# Altium PCB pickplace.PcbDoc
Units mil, origin at the board's own origin, x right, y up, seen from the top; angles counter-clockwise.
Board outline 6000 x 4000 mil, 2 copper layers (Top Layer, Bottom Layer); 137 components, 0 nets, 400 pads, 87 vias.
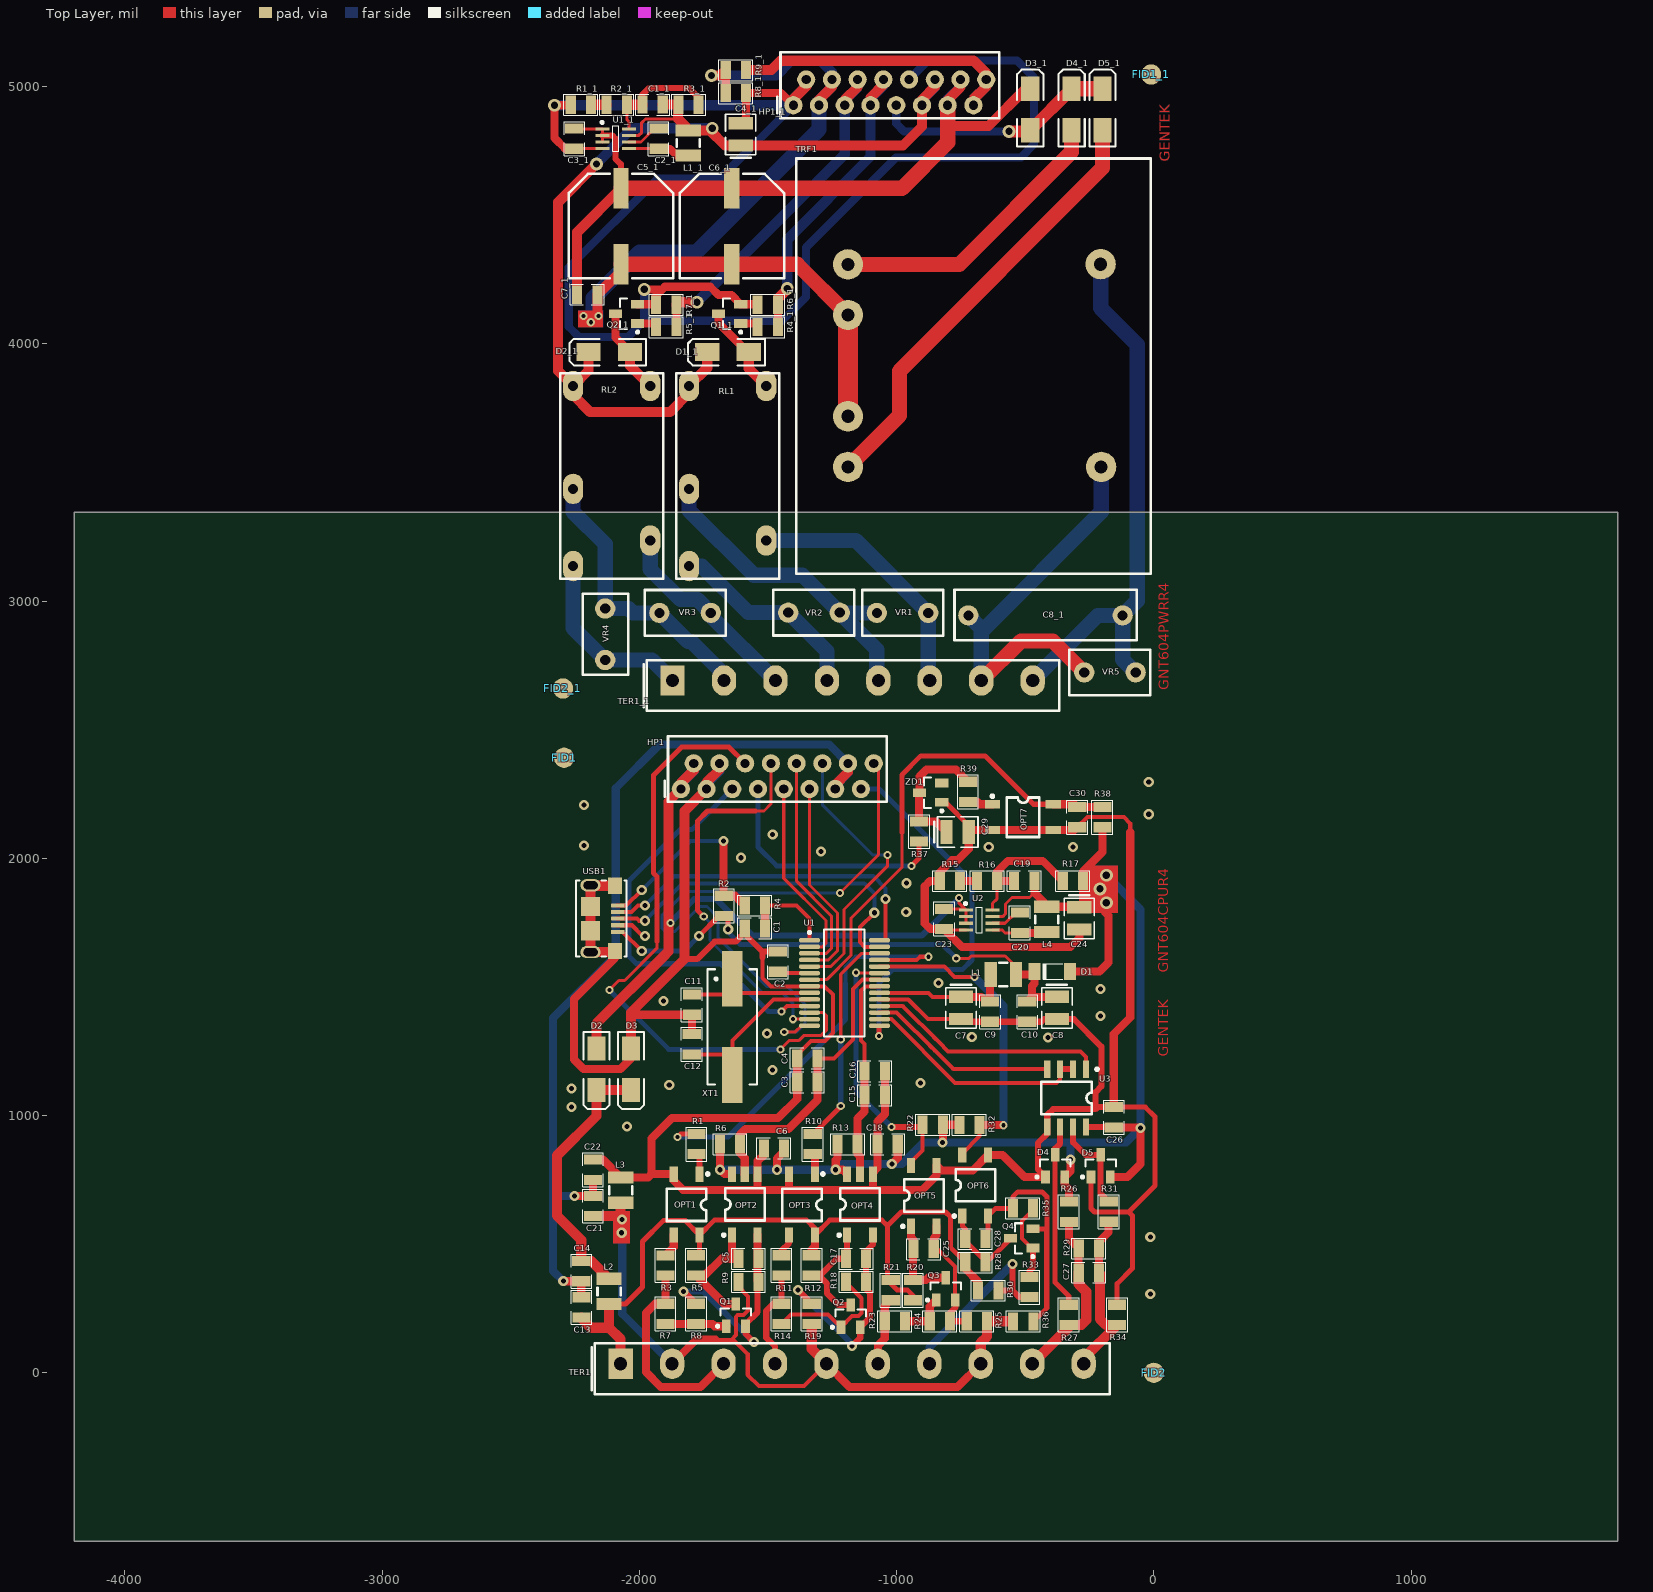
[diagram p0: Top Layer view]
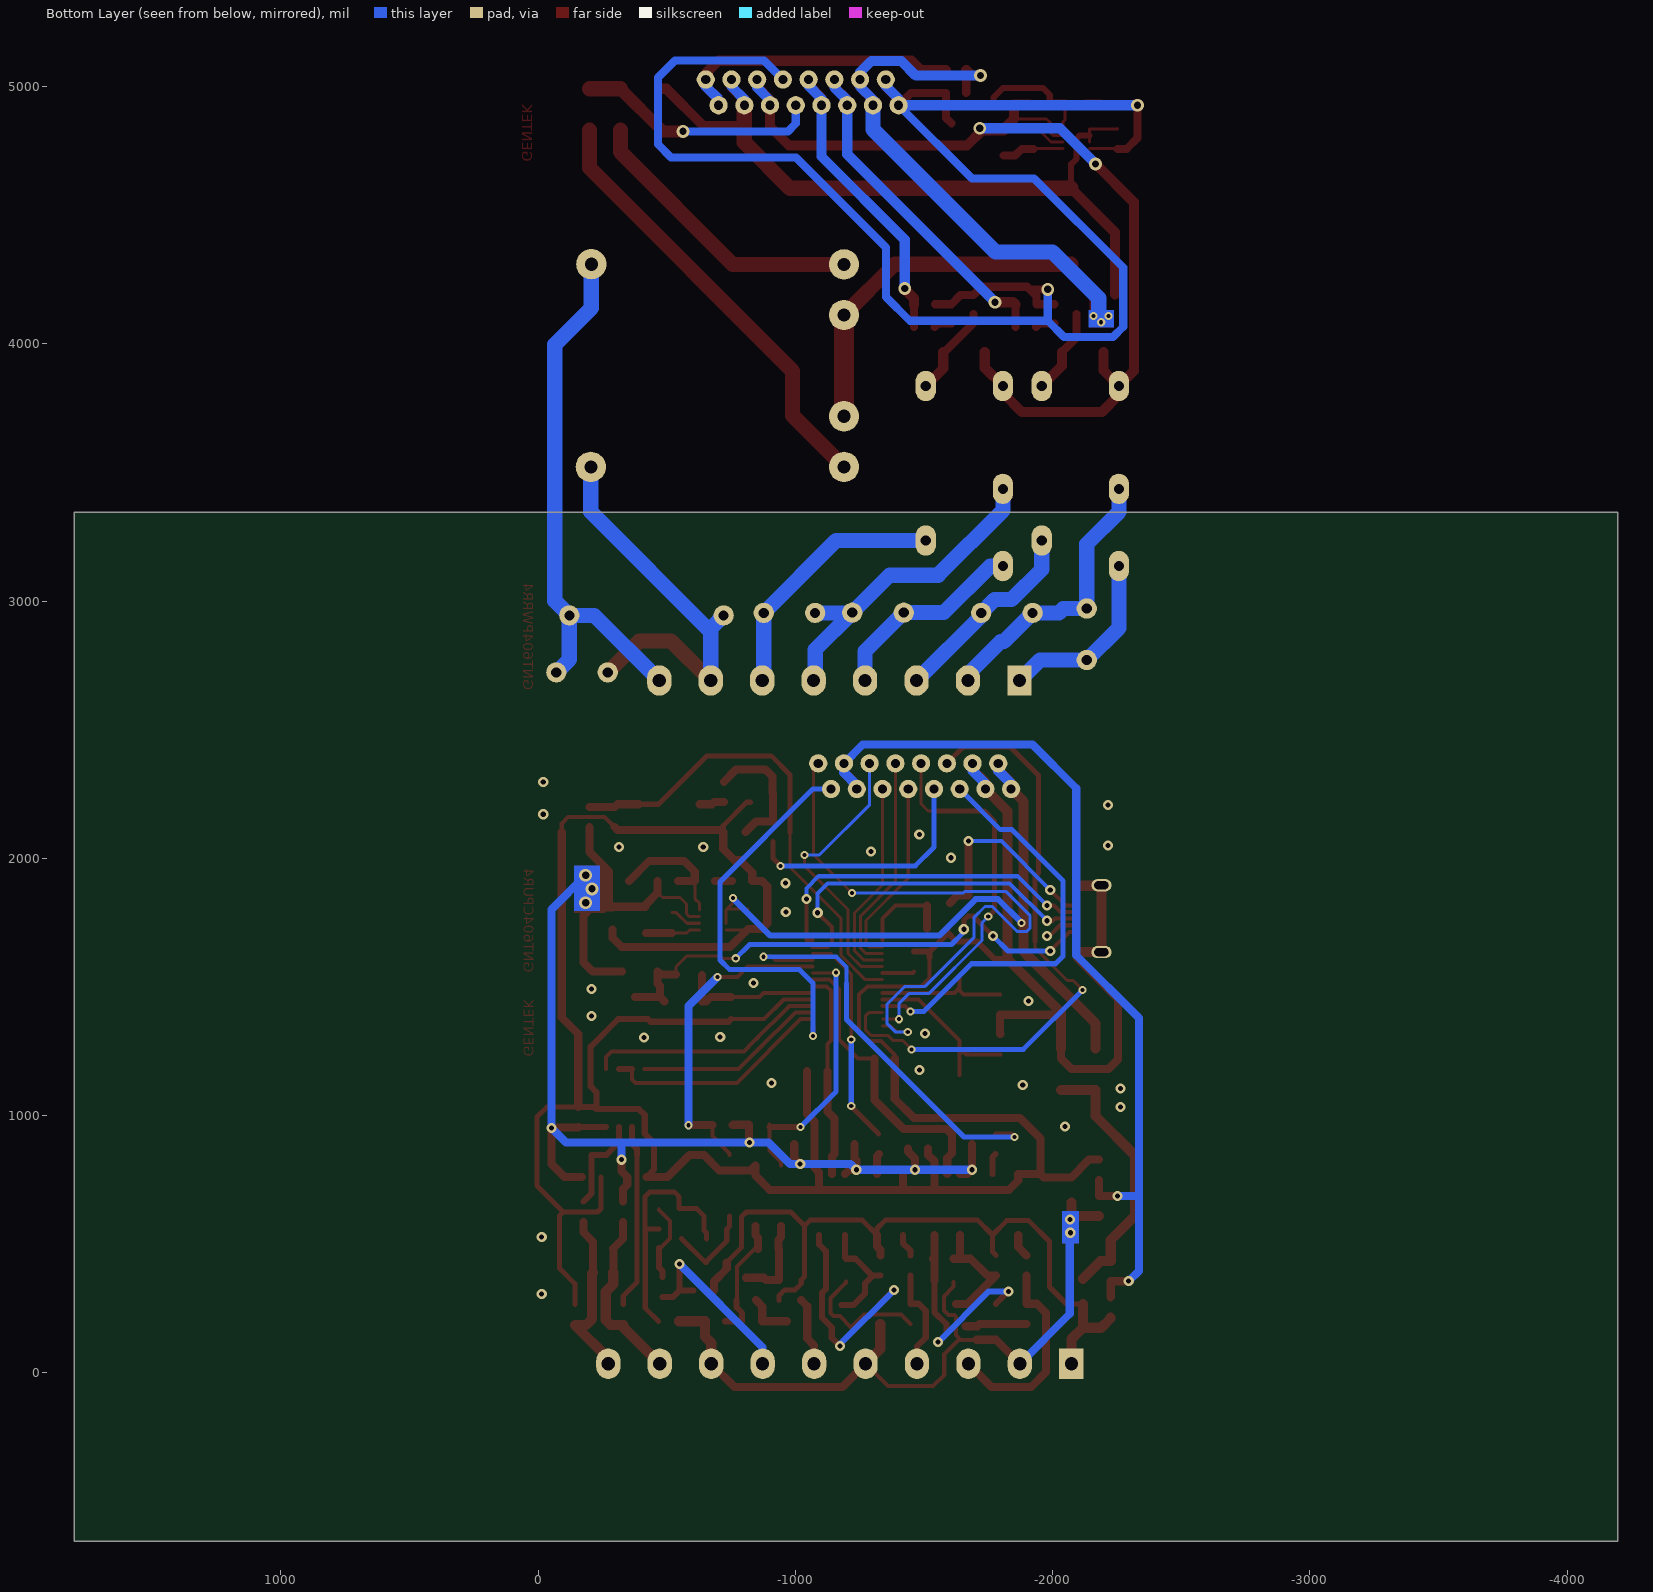
[diagram p1: Bottom Layer view, seen from below]

## Layer stack, top to bottom
Top Solder: solder mask 0.4, Solder Resist, Dk 3.5
Top Layer: signal copper 1.4
Dielectric 1: dielectric 12.6, FR-4, Dk 4.8
Bottom Layer: signal copper 1.4
Bottom Solder: solder mask 0.4, Solder Resist, Dk 3.5

## Board outline
-4197,-655 1803,-655 1803,3345 -4197,3345

## Design rules (kind name [scope] priority, off if disabled: settings)
Clearance [All] p1: gap=10
PolygonConnect [All] p1: connectstyle=Relief reliefconductorwidth=10 reliefentries=4 polygonreliefangle="90 Angle" airgapwidth=10
RoutingVias [All] p1: holewidth=28 width=50 viastyle="Through Hole" minholewidth=28 minwidth=50 maxholewidth=28 maxwidth=50
SolderMaskExpansion [All] p1: expansion=4
Width [All] p1: maxlimit=10 minlimit=10 preferedwidth=10
30 further rules are at their usual default settings.

## Components (designator, comment, footprint, x,y, rotation, side; value= is the part's Value field where it differs from the comment)
C1 "100nF" CC0805 -1551,1727 r180 top
C1_1 "47pF" CC0805 -1948.66,4930.16 r0 top (schematic designator C1)
C2 "100nF" CC0805 -1462,1598 r90 top
C2_1 "470nF" CC0805 -1925.37,4797.27 r270 top (schematic designator C2)
C3 "100pF" CC0805 -1347,1129 r180 top
C3_1 "100nF" CC0805 -2253.13,4797.27 r90 top (schematic designator C3)
C4 "10nF" CC0805 -1347,1221.95 r180 top
C4_1 "47uF/10V" CAPSMDTANTAL-B -1606.47,4814 r90 top (schematic designator C4)
C5 "10nF" CC0805 -1576,443 r0 top
C5_1 "470uF/25V" CAPSMD-10x10 -2072.02,4604.35 r270 top (schematic designator C5)
C6 "100nF" CC0805 -1477,872 r180 top
C6_1 "470uF/25V" CAPSMD-10x10 -1640.92,4604.35 r270 top (schematic designator C6)
C7 "47uF/10V" CAPSMDTANTAL-B -750,1418 r270 top
C7_1 "100nF" CC0805 -2202.93,4190.97 r180 top (schematic designator C7)
C8 "47uF/10V" CAPSMDTANTAL-B -377,1418 r270 top
C8_1 "100nF/275V/X2" CAPAXIAL/275V/X2 -421.43,2943.92 r180 top (schematic designator C8)
C9 "100nF" CC0805 -637,1403.84 r90 top
C10 "100nF" CC0805 -492,1403.84 r90 top
C11 "22pF" CC0805 -1796,1431 r270 top
C12 "22pF" CC0805 -1797.05,1277 r90 top
C13 "100nF" CC0805 -2225,254 r270 top
C14 "100nF" CC0805 -2226.05,395 r90 top
C15 "100pF" CC0805 -1085,1079.05 r0 top
C16 "10nF" CC0805 -1085,1172 r0 top
C17 "10nF" CC0805 -1158,443 r0 top
C18 "100nF" CC0805 -1035,887.95 r180 top
C19 "47pF" CC0805 -504,1912 r0 top
C20 "470nF" CC0805 -521,1749 r270 top
C21 "100nF" CC0805 -2180,648 r270 top
C22 "100nF" CC0805 -2181.05,789 r90 top
C23 "100nF" CC0805 -816,1764 r90 top
C24 "47uF/10V" CAPSMDTANTAL-B -290,1766 r270 top
C25 "100nF" CC0805 -895,481 r0 top
C26 "100nF" CC0805 -156,993 r90 top
C27 "47pF" CC0805 -253.05,389 r180 top
C28 "100nF" CC0805 -694.05,520 r0 top
C29 "47uF/10V" CAPSMDTANTAL-B -763,2102 r0 top
C30 "100nF" CC0805 -298,2160.05 r270 top
D1 "LL4148" CD-SOD80 -330,1560 r180 top
D1_1 "US1M" CD-SMA_DO214 -1655.68,3967.54 r180 top (schematic designator D1)
D2 "M7" CD-SMA_DO214 -2167,1180 r270 top
D2_1 "US1M" CD-SMA_DO214 -2117.3,3967.54 r180 top (schematic designator D2)
D3 "US1M" CD-SMA_DO214 -2033,1180 r270 top
D3_1 "M7" CD-SMA_DO214 -480.49,4910.46 r90 top (schematic designator D3)
D4 "BAV99" SOT23_N -384,802 r90 top
D4_1 "M7" CD-SMA_DO214 -320.06,4910.46 r90 top (schematic designator D4)
D5 "BAV99" SOT23_N -207,802 r90 top
D5_1 "M7" CD-SMA_DO214 -199.98,4910.46 r90 top (schematic designator D5)
FID1 "FIDUCIAL1" FIDUCIAL1 -2293,2390 r0 top
FID1_1 "FIDUCIAL1" FIDUCIAL1 -11,5046.28 r0 top (schematic designator FID1)
FID2 "FIDUCIAL1" FIDUCIAL1 0,-1 r0 top
FID2_1 "FIDUCIAL1" FIDUCIAL1 -2297.42,2659.47 r0 top (schematic designator FID2)
HP1 "DS1015-05_CONFLY" HeaderAntenk90Pin16 -1839,2269 r0 top (schematic designator HP2)
HP1_1 "DS1015-05_CONFLY" HeaderAntenk90Pin16 -1401.75,4927.19 r0 top (schematic designator HP1)
L1 "47uH" INDC2.5X3.3 -585,1548 r0 top
L1_1 "47uH" INDC2.5X3.3 -1810.21,4780.54 r90 top (schematic designator L1)
L2 "47uH" INDC2.5X3.3 -2118,316 r90 top
L3 "47uH" INDC2.5X3.3 -2073,710 r90 top
L4 "47uH" INDC2.5X3.3 -417,1762 r90 top
OPT1 "PC357" SO-4 -1816,653.48 r270 top
OPT2 "PC410" SO-5 -1640.75,535.6 r90 top
OPT3 "PC357" SO-4 -1367.75,653.48 r270 top
OPT4 "PC410" SO-5 -1192.49,535.6 r90 top
OPT5 "PC357" SO-4 -895,687.94 r90 top
OPT6 "PC357" SO-4 -695,728 r90 top
OPT7 "PC357" SO-4 -509,2160 r0 top
Q1 "BC817" SOT23_N -1625,222 r90 top
Q1_1 "BC817" SOT23_N -1647.81,4116.17 r180 top (schematic designator Q1)
Q2 "BC817" SOT23_N -1179,218 r90 top
Q2_1 "BC817" SOT23_N -2048.4,4116.17 r180 top (schematic designator Q2)
Q3 "BC817" SOT23_N -809,324 r90 top
Q4 "BC817" SOT23_N -512,522 r180 top
R1 "470R" CR0805 -1778,888.95 r270 top
R1_1 "120K" CR0805 -2227.54,4929.16 r180 top (schematic designator R1)
R2 "10K" CR0805 -1672,1815 r90 top
R2_1 "10K" CR0805 -2088.1,4929.16 r180 top (schematic designator R2)
R3 "10K" CR0805 -1899,416.95 r90 top
R3_1 "390K" CR0805 -1809.23,4929.16 r180 top (schematic designator R3)
R4 "100R" CR0805 -1551,1816 r180 top
R4_1 "1K" CR0805 -1501.16,4064.98 r0 top (schematic designator R4)
R5 "2.2K" CR0805 -1780,417 r90 top
R5_1 "1K" CR0805 -1895.84,4064.98 r0 top (schematic designator R5)
R6 "1K" CR0805 -1648,888 r180 top
R6_1 "10K" CR0805 -1501.21,4151.6 r180 top (schematic designator R6)
R7 "10K" CR0805 -1899,228.62 r90 top
R7_1 "10K" CR0805 -1895.9,4151.6 r180 top (schematic designator R7)
R8 "10K" CR0805 -1780,228.62 r90 top
R8_1 "0R" CR0805 -1625.17,4974.43 r0 top (schematic designator R8)
R9 "10R" CR0805 -1576,353 r180 top
R9_1 "0R" CR0805 -1625.17,5064 r0 top (schematic designator R9)
R10 "470R" CR0805 -1326,888.95 r270 top
R11 "10K" CR0805 -1448,417 r90 top
R12 "2.2K" CR0805 -1330.95,417 r90 top
R13 "1K" CR0805 -1191,888 r180 top
R14 "10K" CR0805 -1448,228.62 r90 top
R15 "120K" CR0805 -793,1911 r180 top
R16 "10K" CR0805 -648.5,1911.05 r180 top
R17 "390K" CR0805 -315,1912 r0 top
R18 "10K" CR0805 -1157.95,353.95 r0 top
R19 "10R" CR0805 -1330,228.57 r270 top
R20 "2.2K" CR0805 -937,321.09 r90 top
R21 "10K" CR0805 -1023,321.04 r270 top
R22 "10K" CR0805 -860,964 r0 top
R23 "10K" CR0805 -1007,199.95 r0 top
R24 "10K" CR0805 -832,199.95 r0 top
R25 "10R" CR0805 -688,199.95 r0 top
R26 "10K" CR0805 -330.05,625.95 r270 top
R27 "10R" CR0805 -331,225.05 r90 top
R28 "2.2K" CR0805 -694,429 r0 top
R29 "10K" CR0805 -253,483 r0 top
R30 "10K" CR0805 -644,320 r0 top
R31 "10R" CR0805 -176,626 r90 top
R32 "10K" CR0805 -717,963.05 r180 top
R33 "10K" CR0805 -483.99,333 r90 top
R34 "10K" CR0805 -143,225 r90 top
R35 "10K" CR0805 -509.09,639 r180 top
R36 "10R" CR0805 -508,199 r180 top
R37 "2,2K" CR0805 -913,2104 r90 top
R38 "10K" CR0805 -200,2160 r270 top
R39 "100R" CR0805 -722,2258 r270 top
RL1 "NAIS_JQ1P-5V" NAIS_JQ1P-XXV -1656.67,3486.24 r270 top
RL2 "NAIS_JQ1P-5V" NAIS_JQ1P-XXV -2107.46,3486.24 r270 top
TER1 "Terminal_H5.08x10" Terminal_H5.08x10 -2073,35 r0 top
TER1_1 "Terminal_H5.08x8" Terminal_H5.08x8 -1871.24,2690.97 r0 top (schematic designator TER1)
TRF1 "TRF-2X18-3.2VA" TRF-EI38/13,5 -697.02,3914.39 r180 top
U1 "PIC18F25K80-I/SS" SSOP-SS28_N -1203,1515 r0 top
U1_1 "LT3470ETS8" TS8_N -2091.71,4797.27 r0 top (schematic designator U1)
U2 "LT3470ETS8" TS8_N -679,1760 r0 top
U3 "SN75176BDR" SO-8 -264,1180 r270 top
USB1 "USB_MICRO" MICRO_USB -2137.34,1765.08 r0 top
VR1 "TVR07431" TVR07431 -877.14,2953.76 r180 top
VR2 "TVR07431" TVR07431 -1421.43,2954.75 r0 top
VR3 "TVR07431" TVR07431 -1722.61,2953.76 r180 top
VR4 "TVR07431" TVR07431 -2133.05,2770.69 r90 top
VR5 "TVR07431" TVR07431 -270.84,2722.46 r0 top
XT1 "20MHz" HC49/4H_SMX -1639,1344 r270 top
ZD1 "ZNR5V1" SOT23_N -866,2255 r180 top

## Footprints (in the part's own frame and the unit in brackets; to place one, negate y for a bottom-side part, rotate by r counter-clockwise, add the part's x,y. Pads: shape width x height; smd on the part's side, far side on the other; paste and mask are expansions set on the pad)
CAPAXIAL/275V/X2 [mm]
  round 2 hole 1: 1(-7.62,0) 2(7.62,0)
  silkscreen extent -9.02,-2.54 8.98,2.46, body extent -8.86,-2.39 8.84,2.31, height 2
CAPSMD-10x10 [mm]
  rect 4x1.5 smd: 1(0,0) 2(7.5,0)
  silkscreen extent -1.42,-5.13 8.86,5.17, body extent -1.17,-4.9 8.61,4.95, height 2
CAPSMDTANTAL-B [mm]
  rect 1.2x2.4 smd: 1(-1.1,0) 2(1.1,0)
  silkscreen extent -2.29,-1.5 2.01,1.5, body extent -1.82,-1.4 1.81,1.4, height 2
CC0805 [mm]
  rect 1x1.8 smd: 1(-1,0) 2(1,0)
  silkscreen extent -1.68,-1.04 1.68,1.01, body extent -1.12,-0.76 1.19,0.76, height 1
CD-SMA_DO214 [mm] "DO-214-AC/SMA; 2 C-Bend Leads; Body 5 x 2.7 mm, inc. leads (LxW)"
  rect 2.4x1.8 smd: 1(-2.05,0) 2(2.05,0)
  silkscreen extent -3.65,-1.3 3.95,1.3, body extent -2.69,-0.76 2.79,0.76, height 2
CD-SOD80 [mm]
  rect 1.2x1.7 smd: 1(-0.095,0.005) 2(3.405,0.005)
  silkscreen extent 0.64,-0.76 2.55,0.77, body extent -0.51,-0.76 3.68,0.76, height 2
CR0805 [mm]
  rect 1x1.8 smd: 1(-1,0) 2(1,0)
  silkscreen extent -1.68,-1.04 1.68,1.02, body extent -1.17,-0.76 1.22,0.79, height 0.4
FIDUCIAL1 [mm]
  round 2 smd mask+1: 1(0.003,0.013)
HC49/4H_SMX [mm] "Quartz Crystal, SM; Body 13.4 (inc. leads) x 4.9 mm (LxW max)"
  rect 5.5x2 smd: 1(-4.75,0) 2(4.75,0)
  silkscreen extent -5.7,-2.45 5.7,2.45, body extent -5.59,-2.34 5.59,2.34, height 2
HeaderAntenk90Pin16 [mm]
  round 1.8 hole 0.9: 1(0,0) 2(1.27,2.54) 3(2.54,0) 4(3.81,2.54) 5(5.08,0) 6(6.35,2.54) 7(7.62,0) 8(8.89,2.54) 9(10.16,0) 10(11.43,2.54) 11(12.7,0) 12(13.97,2.54) 13(15.24,0) 14(16.51,2.54) 15(17.78,0) 16(19.05,2.54)
  silkscreen extent -1.57,-1.27 20.32,5.23, body extent -1.02,-1.02 20.07,4.44, height 1
INDC2.5X3.3 [mm] "Chip Inductor, Body 4.5x1.6mm, IPC Low Density"
  rect 1.2x2.5 smd: 1(-1.25,0) 2(1.25,0)
  silkscreen extent -0.39,-1.14 0.38,1.14, body extent -1.86,-1.27 1.85,1.27, height 1.8
MICRO_USB [mm] "Connector; USB2.0, Type A, SM; 5 Position; Right Angle"
  rect 1.35x0.4 smd: 1(1.338,1.3) 2(1.338,0.65) 3(1.338,0) 4(1.338,-0.65) 5(1.338,-1.3)
  oval 2x1.2 hole 0.8 slot 1.4 at 0 deg: 6(-1.338,-3.3) 6(-1.338,3.3)
  rect 1.9x1.9 smd: 6(-1.338,-1.2) 6(-1.338,1.2)
  rect 1.4x1.6 smd: 6(1.088,-3.2) 6(1.088,3.25)
  silkscreen extent -2.79,-3.75 2.21,3.75
NAIS_JQ1P-XXV [mm]
  oval 3x2 hole 1: 1(1.28,-3.821) 2(6.373,3.799) 3(8.9,-3.821) 4(-8.88,-3.821) 5(-8.88,3.799)
  silkscreen extent -10.15,-5.09 10.17,5.07, body extent -10.01,-4.95 10.03,4.93, height 1.75
SO-4 [mm]
  rect 1.5x0.8 smd: 1(-3.006,1.267) 2(-3.006,-1.283) 3(2.994,-1.283) 4(2.994,1.267)
  silkscreen extent -3.17,-1.97 1.62,2.21, body extent -2.31,-2.31 2.39,2.26, height 1.75
SO-5 [mm]
  rect 1.5x0.8 smd: 1(0,0) 3(0,-2.55) 4(6,-2.55) 5(6,-1.27) 6(6,0)
  silkscreen extent -0.16,-3.23 4.62,0.94, body extent 0.63,-3.56 5.33,1.02, height 1.75
SO-8 [mm]
  rect 1.7x0.6 smd: 1(-0.001,-0.014) 2(-0.001,-1.284) 3(-0.001,-2.554) 4(-0.001,-3.824) 5(5.699,-3.824) 6(5.699,-2.554) 7(5.699,-1.284) 8(5.699,-0.014)
  silkscreen extent -0.15,-4.42 4.45,1.24, body extent 0.63,-4.7 5.08,0.79, height 1.75
SOT23_N [mm] "SOT23, 3-Leads, Body 2.9x1.3mm, Pitch 0.95mm, Lead Span 2.3mm, IPC Medium Density"
  rect 1.3x0.85 smd: 1(-1.05,0.95) 2(-1.05,-0.95) 3(1.143,0)
  silkscreen extent -1.17,-1.5 0.7,1.92, body extent -0.7,-1.5 0.7,1.5, height 1.14
SSOP-SS28_N [mm] "SOP, 28-Leads, Body 10.2x5.2mm, Pitch 0.65mm, IPC Medium Density"
  oval 2.1x0.45 smd: 1(-3.45,4.225) 2(-3.45,3.575) 3(-3.45,2.925) 4(-3.45,2.275) 5(-3.45,1.625) 6(-3.45,0.975) 7(-3.45,0.325) 8(-3.45,-0.325) 9(-3.45,-0.975) 10(-3.45,-1.625) 11(-3.45,-2.275) 12(-3.45,-2.925) 13(-3.45,-3.575) 14(-3.45,-4.225) 15(3.45,-4.225) 16(3.45,-3.575) 17(3.45,-2.925) 18(3.45,-2.275) 19(3.45,-1.625) 20(3.45,-0.975) 21(3.45,-0.325) 22(3.45,0.325) 23(3.45,0.975) 24(3.45,1.625) 25(3.45,2.275) 26(3.45,2.925) 27(3.45,3.575) 28(3.45,4.225)
  silkscreen extent -3.57,-5.3 2,5.3, body extent -2.7,-5.3 2.7,5.3, height 2
Terminal_H5.08x8 [mm]
  rect 2.4x3 hole 1.3: 1(0,0)
  oval 2.4x3 hole 1.3: 2(5.08,0) 3(10.16,0) 4(15.24,0) 5(20.32,0) 6(25.4,0) 7(30.48,0) 8(35.56,0)
  silkscreen extent -2.85,-3 38.18,2, body extent -2.37,-2.82 38,1.83, height 2
Terminal_H5.08x10 [mm]
  rect 2.4x3 hole 1.3: 1(0,0)
  oval 2.4x3 hole 1.3: 2(5.08,0) 3(10.16,0) 4(15.24,0) 5(20.32,0) 6(25.4,0) 7(30.48,0) 8(35.56,0) 9(40.64,0) 10(45.72,0)
  silkscreen extent -2.85,-3 48.3,2, body extent -2.36,-2.82 48.13,1.83, height 2
TRF-EI38/13,5 [mm]
  round 3 hole 1.3: 1(-12.496,9.988) 2(-12.446,-10.033) 3(12.504,-10.012) 4(12.504,-5.012) 6(12.504,4.988) 7(12.504,9.988)
  silkscreen extent -17.4,-20.47 17.6,20.53, body extent -17.15,-20.19 17.4,20.32, height 13
TS8_N [mm] "SOT23, 5-Leads, Body 3x1.6mm, Pitch 0.95mm, Lead Span 2.8mm, IPC Medium Density"
  rect 1.4x0.3 smd: 1(-1.31,0.975) 2(-1.31,0.325) 3(-1.31,-0.325) 4(-1.31,-0.975) 5(1.31,-0.975) 6(1.31,-0.325) 7(1.31,0.325) 8(1.31,0.975)
  silkscreen extent -1.48,-1.25 0.28,1.73, body extent -0.76,-1.44 0.74,1.46, height 1.45
TVR07431 [mm]
  round 2 hole 1: 1(0,0) 2(5.08,0)
  silkscreen extent -1.47,-2.26 6.53,2.24, body extent -1.32,-2.11 6.38,2.08, height 2

## Part data
C1 C1_1 C2 C2_1 C3 C3_1 C4 C5 C6 C7_1 C9 C10 C11 C12 C13 C14 C15 C16 C17 C18 C19 C20 C21 C22 C23 C25 C26 C27 C28 C30: library part CC-0805, "Ceramic Chip Capacitor - Standard"
C4_1 C7 C8 C24 C29: library part CAPSMDTANTAL-B, "CA45 Chip Tantalum Capacitors"
C5_1 C6_1: library part CAPSMD10x10, "Polarized Capacitor (SMD)"
C8_1: library part "CAP AXIAL SER", "Ceramic Capacitor - Standard"
D1: library part CD-SOD80, "ChipDiode-MiniMELF-SOD80"
D1_1 D2_1 D3: "ChipDiodeSMA, ultra fast diode"
D2 D3_1 D4_1 D5_1: library part CD-SMA_DO214, "ChipDiodeSMA"
D4 D5: "Ultrafast, Soft Recovery Diode"
HP1 HP1_1: library part "Header Antenk90PinF16", "Header, 16-Pin, 90 DEGREES"
L1 L1_1 L2 L3 L4: library part "Inductor Iron_47uH", "Magnetic-Core Inductor_SMD"
OPT1 OPT3 OPT5 OPT6 OPT7: "Optoisolator"
OPT2 OPT4: "Ultra-high Speed Response  OPIC Photocoupler"
Q1 Q1_1 Q2 Q2_1 Q3 Q4: library part BC817-40, "NPN General Purpose Amplifier"
R1 R1_1 R2 R2_1 R3 R3_1 R4 R4_1 R5 R5_1 R6 R6_1 R7 R7_1 R8 R8_1 R9 R9_1 R10 R11 R12 R13 R14 R15 R16 R17 R18 R19 R20 R21 R22 R23 R24 R25 R26 R27 R28 R29 R30 R31 R32 R33 R34 R35 R36 R37 R38 R39: library part CR-0805, "ChipResistor0805"
RL1 RL2: library part NAIS_JQ1P-24V, "Single-Pole Dual-Throw Relay"
TER1: "Terminal Block Horizontal 5.08mm 10 pin"
TER1_1: "Terminal Block Horizontal 5.08mm 8 pin"
U1: "Flash Microcontroller with 10-Bit A/D and nanoWatt Technology, 32K Flash, 28-Pin SSOP, Industrial Temperature Range, Tape and Reel"
U1_1 U2: "200mA, Micropower Buck Regulator"
U3: "Low-Power,RS-485/RS-422 Transceiver"
USB1: "Connector; USB2.0, Type A, SM; 5 Position; Right Angle"
VR1 VR2 VR3 VR4 VR5: "Varistor (Voltage-Sensitive Resistor)-275V"
XT1: library part XTALL_SMD, "HS-XTALL(SMD)"
ZD1: library part ZENER2-SOT23, "Zener Diode"

## Via types
v1: diameter 39.37, hole 19.68, Top Layer to Bottom Layer, 52 vias
v2: diameter 31.5, hole 15.75, Top Layer to Bottom Layer, 24 vias
v3: diameter 50, hole 28, Top Layer to Bottom Layer, 11 vias

## Nets (pads, with @x,y where several pads share a name; then routed paths per layer and width w, separated by ;. In a path a pad name is that pad's centre, name@x,y a point inside that pad or via, vN(x,y) a via of type N, cw(c..) or ccw(c..) an arc to the next point about the centre after c; other vN are vias at no path point)
pads on no net: C1.1 C1.2 C1_1.1 C1_1.2 C2.1 C2.2 C2_1.1 C2_1.2 C3.1 C3.2 C3_1.1 C3_1.2 C4.1 C4.2 C4_1.1 C4_1.2 C5.1 C5.2 C5_1.1 C5_1.2 C6.1 C6.2 C6_1.1 C6_1.2 C7.1 C7.2 C7_1.1 C7_1.2 C8.1 C8.2 C8_1.1 C8_1.2 C9.1 C9.2 C10.1 C10.2 C11.1 C11.2 C12.1 C12.2 C13.1 C13.2 C14.1 C14.2 C15.1 C15.2 C16.1 C16.2 C17.1 C17.2 C18.1 C18.2 C19.1 C19.2 C20.1 C20.2 C21.1 C21.2 C22.1 C22.2 C23.1 C23.2 C24.1 C24.2 C25.1 C25.2 C26.1 C26.2 C27.1 C27.2 C28.1 C28.2 C29.1 C29.2 C30.1 C30.2 D1.1 D1.2 D1_1.1 D1_1.2 D2.1 D2.2 D2_1.1 D2_1.2 D3.1 D3.2 D3_1.1 D3_1.2 D4.1 D4.2 D4.3 D4_1.1 D4_1.2 D5.1 D5.2 D5.3 D5_1.1 D5_1.2 FID1.1 FID1_1.1 FID2.1 FID2_1.1 HP1.1 HP1.2 HP1.3 HP1.4 HP1.5 HP1.6 HP1.7 HP1.8 HP1.9 HP1.10 HP1.11 HP1.12 HP1.13 HP1.14 HP1.15 HP1.16 HP1_1.1 HP1_1.2 HP1_1.3 HP1_1.4 HP1_1.5 HP1_1.6 HP1_1.7 HP1_1.8 HP1_1.9 HP1_1.10 HP1_1.11 HP1_1.12 HP1_1.13 HP1_1.14 HP1_1.15 HP1_1.16 L1.1 L1.2 L1_1.1 L1_1.2 L2.1 L2.2 L3.1 L3.2 L4.1 L4.2 OPT1.1 OPT1.2 OPT1.3 OPT1.4 OPT2.1 OPT2.3 OPT2.4 OPT2.5 OPT2.6 OPT3.1 OPT3.2 OPT3.3 OPT3.4 OPT4.1 OPT4.3 OPT4.4 OPT4.5 OPT4.6 OPT5.1 OPT5.2 OPT5.3 OPT5.4 OPT6.1 OPT6.2 OPT6.3 OPT6.4 OPT7.1 OPT7.2 OPT7.3 OPT7.4 Q1.1 Q1.2 Q1.3 Q1_1.1 Q1_1.2 Q1_1.3 Q2.1 Q2.2 Q2.3 Q2_1.1 Q2_1.2 Q2_1.3 Q3.1 Q3.2 Q3.3 Q4.1 Q4.2 Q4.3 R1.1 R1.2 R1_1.1 R1_1.2 R2.1 R2.2 R2_1.1 R2_1.2 R3.1 R3.2 R3_1.1 R3_1.2 R4.1 R4.2 R4_1.1 R4_1.2 R5.1 R5.2 R5_1.1 R5_1.2 R6.1 R6.2 R6_1.1 R6_1.2 R7.1 R7.2 R7_1.1 R7_1.2 R8.1 R8.2 R8_1.1 R8_1.2 R9.1 R9.2 R9_1.1 R9_1.2 R10.1 R10.2 R11.1 R11.2 R12.1 R12.2 R13.1 R13.2 R14.1 R14.2 R15.1 R15.2 R16.1 R16.2 R17.1 R17.2 R18.1 R18.2 R19.1 R19.2 R20.1 R20.2 R21.1 R21.2 R22.1 R22.2 R23.1 R23.2 R24.1 R24.2 R25.1 R25.2 R26.1 R26.2 R27.1 R27.2 R28.1 R28.2 R29.1 R29.2 R30.1 R30.2 R31.1 R31.2 R32.1 R32.2 R33.1 R33.2 R34.1 R34.2 R35.1 R35.2 R36.1 R36.2 R37.1 R37.2 R38.1 R38.2 R39.1 R39.2 RL1.1 RL1.2 RL1.3 RL1.4 RL1.5 RL2.1 RL2.2 RL2.3 RL2.4 RL2.5 TER1.1 TER1.2 TER1.3 TER1.4 TER1.5 TER1.6 TER1.7 TER1.8 TER1.9 TER1.10 TER1_1.1 TER1_1.2 TER1_1.3 TER1_1.4 TER1_1.5 TER1_1.6 TER1_1.7 TER1_1.8 TRF1.1 TRF1.2 TRF1.3 TRF1.4 TRF1.6 TRF1.7 U1.1 U1.2 U1.3 U1.4 U1.5 U1.6 U1.7 U1.8 U1.9 U1.10 U1.11 U1.12 U1.13 U1.14 U1.15 U1.16 U1.17 U1.18 U1.19 U1.20 U1.21 U1.22 U1.23 U1.24 U1.25 U1.26 U1.27 U1.28 U1_1.1 U1_1.2 U1_1.3 U1_1.4 U1_1.5 U1_1.6 U1_1.7 U1_1.8 U2.1 U2.2 U2.3 U2.4 U2.5 U2.6 U2.7 U2.8 U3.1 U3.2 U3.3 U3.4 U3.5 U3.6 U3.7 U3.8 USB1.1 USB1.2 USB1.3 USB1.4 USB1.5 USB1.6 VR1.1 VR1.2 VR2.1 VR2.2 VR3.1 VR3.2 VR4.1 VR4.2 VR5.1 VR5.2 XT1.1 XT1.2 ZD1.1 ZD1.2 ZD1.3
copper on no net: | length 115999.3
  Top Layer w11.81: -2253.13,4757.9 -2252.14,4758.88 -2143.28,4758.88 ; -2253.13,4836.64 -2252.14,4835.65 -2143.28,4835.65 -2143.28,4810.06 -2143.28,4784.47 ; v2(-2117,1488) -2080,1525 -2057.67,1525 -1931,1651.67 -1931,1676 ; -2048.73,4929.16 -2048.73,4870.43 -2040.14,4861.84 -2040.14,4835.65 ; -2040.14,4758.88 -1926.36,4758.88 -1925.37,4757.9 ; -2040.14,4784.47 -1994.27,4784.47 -1942.1,4836.64 -1925.37,4836.64 ; -2040.14,4810.06 -2002.14,4810.06 -1991.32,4820.89 -1991.32,4859.28 -1976.55,4874.04 -1849.6,4874.04 ; -1667,1242 -1639,1242 -1639,1156.99 ; -1548,2184 -1516,2184 -1489,2211 -1489,2369 ; -1540.35,535.6 -1536.63,502.28 -1536.63,443 -1536.63,398 -1536.63,353 ; v2(-1452,1257) -1417,1292 -1379,1292 -1359.35,1311.65 -1293.35,1311.65 -1272,1333 -1272,1386 -1285.84,1399.84 -1338.83,1399.84 ; -1439,2269 -1439,1922 -1275,1758 -1275,1668.68 -1287.94,1655.75 -1338.83,1655.75 ; v2(-1437,1325) -1394,1325 -1370.34,1348.66 -1338.83,1348.66 ; v2(-1402.41,1374.25) -1338.83,1374.25 ; -1389,2369 -1389,1911 -1253,1775 -1253,1650 -1272.84,1630.16 -1338.83,1630.16 ; -1339,2269 -1339,1896 -1230,1787 -1230,1640 -1265.43,1604.57 -1338.83,1604.57 ; -1338.83,1527.8 -1272.2,1527.8 -1178,1622 -1178,1766 -980,1964 -980,2101 ; -1338.83,1578.98 -1256.02,1578.98 -1205,1630 -1205,1800.82 -1035,1970.82 v2(-1035,2013) ; -1326,928.32 -1324.09,928.32 ; v2(-1220,1865) -1071,2014 -1071,2351 -1089,2369 ; v2@-1217.41,1035 v2(-1217.41,1037.59) ; v2(-1217.41,1296) -1217.41,1548.59 -1135.84,1630.16 -1067.17,1630.16 ; v2(-1158,1555) -1156.39,1553.39 -1067.17,1553.39 ; -1092.1,711.1 -1092,711 ; v2@-1069.41,1309.41 v2(-1069,1309) ; -1069.41,1346.43 -1067.17,1348.66 ; -899.37,955 -899.37,964 ; -816,1803.37 -735.56,1803.37 ; -812.98,1721.61 -730.57,1721.61 ; v2(-768.41,1611) -719,1611 -710,1620 -578,1620 -535.79,1577.79 -535.79,1548 ; v2(-757,1845) -757,1824.81 -735.56,1803.37 ; -730.57,1747.2 -730.57,1772.8 -730.57,1798.39 -735.56,1803.37 ; -687.92,1911 -687.87,1911.05 ; -627.43,1721.61 -590.61,1721.61 -578.63,1709.63 -521,1709.63 ; -627.43,1747.2 -578.8,1747.2 -537.63,1788.37 -521,1788.37 ; -627.43,1772.8 -588.2,1772.8 -577,1784 -577,1822 -552,1847 -483.26,1847 -464.63,1865.63 ; -627.43,1798.39 -627.43,1824.57 -609.13,1842.87 -609.13,1911.05 ; v2@-586.05,963.05 v2(-585,962) ; -544.32,1911.05 -543.37,1912 ; -470.66,559.4 -416.6,559.4 -416,559.4 ; -469.72,632.94 -469.72,639 ; -420.16,1709.63 -417,1712.79
  Top Layer w15.75: -2084.68,1713.9 -2065.9,1713.9 v1(-1991,1639) ; -2084.68,1739.49 -2029.49,1739.49 -1988,1698 v1(-1978,1698) ; -2084.68,1765.08 -2009.08,1765.08 -2001,1757 v1(-1978,1757) ; -2084.68,1790.67 -2030.33,1790.67 -2005,1816 v1(-1978,1816) ; -2084.68,1816.26 -2051.74,1816.26 v1(-1991,1877) ; -1797.05,1237.63 -1662.63,1237.63 -1667,1242 ; -1796,1470.37 -1654.63,1470.37 -1639,1486 -1639,1497 ; -1704,128 -1643,128 ; -1639,1156.99 -1639,1291 -1478.98,1451.02 -1338.83,1451.02 ; -1639,1531.01 -1639,1497 ; -1615.37,353 -1615.37,334.37 -1577.49,296.49 -1577.49,242.51 -1596,224 -1618,224 -1625,217 -1625,146 -1643,128 ; -1522.37,1614 -1522.37,1535.37 -1489.2,1502.2 -1338.83,1502.2 -1280.2,1502.2 -1248,1470 -1248,1320 -1278,1290 -1333,1290 -1386.37,1236.63 -1386.37,1221.95 ; -1511.63,1816 -1390,1816 -1338.83,1764.83 -1338.83,1681.34 ; -1462,1558.63 -1456.76,1553.39 -1338.83,1553.39 ; -1448,189.25 -1410.25,227 -1266.74,227 -1216.4,176.66 -1173.06,220 -1149,220 -1137,232 -1137,289.44 -1197.32,349.76 -1197.32,353.95 ; v2(-1448,1404) -1426.57,1425.43 -1338.83,1425.43 ; -1338.83,1476.61 -1618.61,1476.61 -1639,1497 ; -1307.63,1221.95 -1243.05,1221.95 -1169,1296 -1169,1491 -1132.2,1527.8 -1067.17,1527.8 ; -1273,35 -1360,-52 -1535,-52 -1579,-8 -1579,72 -1635,128 -1643,128 ; -1124.37,1172 -1124.37,1278.37 -1138,1292 -1138,1486 -1121.8,1502.2 -1067.17,1502.2 ; v1(-1087,1788) -1143,1732 -1143,1674 -1124.75,1655.75 -1067.17,1655.75 ; -1067.17,1374.25 -1020.25,1374.25 -773,1127 -378,1127 -364.53,1140.47 -364.53,1180.02 ; -1067.17,1399.84 -999.84,1399.84 -850,1250 ; -1067.17,1425.43 -976.43,1425.43 -836,1285 ; -1067.17,1451.02 -955.02,1451.02 -878.69,1374.69 -750,1374.69 ; -1067.17,1476.61 -875.62,1476.61 -860.31,1461.31 -750,1461.31 ; -1067.17,1578.98 -814.98,1578.98 -775,1539 v2(-698,1539) ; -1067.17,1604.57 -922.43,1604.57 -910,1617 v2(-877,1617) ; -1067.17,1681.34 -1043.66,1681.34 -1043,1682 v1(-1043,1841) ; -944.9,805.82 -944.9,819.1 -899.37,864.63 -899.37,964 ; -873,1273 -850,1250 ; -855.63,481 -842,481 -774,413 -774,285.06 -771.6,282.66 ; -854,1303 -836,1285 ; -744.9,845.88 -744.9,852.1 -677.63,919.37 -677.63,963.05 ; -637,1545.21 -634.21,1548 ; -470.66,484.6 -476.6,484.6 -513,521 -513,589.66 -469.72,632.94 ; -414.53,1180.02 -780.02,1180.02 -850,1250 ; -298,2120.68 -258.68,2160 -117,2160 -92,2135 -92,2101 ; -264.53,1180.02 -264.53,1228 -285.53,1249 -800,1249 -836,1285
  Top Layer w19.68: -2118,266.79 -2054.21,266.79 -1988,333 -1988,510 -1907,591 -1821.5,591 -1766.1,535.6 ; -1931,1676 -1931,1928 -1945,1942 -1945,2323 -1835.5,2432.5 -1652.5,2432.5 -1589,2369 ; v2(-1852,916) -1839.68,928.32 -1778,928.32 ; -1780,456.37 -1766.1,470.27 -1766.1,535.6 ; v1(-1769,1697) -1690.37,1775.63 -1672,1775.63 -1655,1758.63 v1(-1655,1724) ; v2(-1750,1773) -1775,1798 -1775,2144 -1735,2184 -1548,2184 ; -1324.09,928.32 v2@-1217.41,1035 ; v2@-1069.41,1309.41 -1069.41,1346.43 ; -980,2101 -980,2324 -906,2398 -656.41,2398 -468.31,2209.9 -391.12,2209.9 ; v2(-942.41,1970.31) -913,1999.72 -913,2064.63 ; -937,281.72 -937,300 -959,322 -999,322 -1023,346 -1023,360.41 -1036,373.41 -1036,571 ; -824.66,2217.6 -810.6,2217.6 -719.69,2126.69 -719.69,2102 ; -744.9,609.66 -744.9,569.9 -733.42,558.42 -733.42,520 -733.42,512.42 -654.63,433.63 -654.63,429 -650,429 -557,522 ; -733.37,429 -733.37,429.37 -790,486 -790,605 -810,625 -982,625 -1036,571 ; -654.68,520 -654.68,543.32 -644.5,553.5 -644.5,609.66 -615.16,639 -548.46,639 -548.46,683.54 -529,703 -435,703 -416,684 -416,559.4 ; -470.66,559.4 -416.6,559.4 -416.6,251.03 -468.63,199 ; -384,847 -384,351 -331,298 -331,264.42 ; -244.4,760.66 -244.4,638.4 -231,625 -98,625 ; -156,1032.37 -33.37,1032.37 4,995 4,727 -98,625 ; -143,264.37 -143,346 -84,405 -84,611 -98,625 ; -1766.1,535.6 -1708.7,593 -1350,593 -1317.85,560.85 -1317.85,535.6 -1260.45,593 -1058,593 -1036,571
  Top Layer w23.62: -2143.28,4810.06 -2105.49,4810.06 -2093.4,4797.98 -2093.4,4719.24 ; -2093.4,4718.53 -2093.4,4719.24 ; -2072.02,4604.35 -2072.02,4697.86 -2093.4,4719.24 ; -1989.03,4929.16 -1989.03,4967.86 -1961.79,4995.1 -1808.24,4995.1 -1769.86,4956.72 -1769.86,4929.16 ; v1(-1828.01,316) -1780,267.99 ; -1825,1608 -1776,1608 -1708,1676 -1626,1676 -1590.37,1711.63 ; -1778,849.58 -1766.1,837.68 -1766.1,771.82 ; -1590.37,1727 -1590.37,1711.63 ; v1(-1555,119) -1587.6,151.6 -1587.6,180.66 -1587.6,188.4 -1540.35,235.65 -1540.35,357.72 ; -1522.37,1614 -1522.37,1637.37 ; -1473,35 -1473,102 -1507,136 -1507,240 -1479.01,267.99 -1448,267.99 -1448,377.63 ; -1462,1637.37 -1522.37,1637.37 ; -1448,456.37 -1448,474 -1418.24,503.76 -1418.24,535.6 ; v1(-1384,321) -1383.06,321 -1330,267.94 ; -1330.95,377.63 -1301.63,377.63 ; -1192.49,535.6 -1192.49,447.88 -1197.37,443 -1234,443 -1299.37,377.63 -1301.63,377.63 ; -1179,263 -1226,263 -1271.5,308.5 -1271.5,347.5 -1301.63,377.63 ; v1(-1173,104) -1141.6,135.4 -1141.6,176.66 -1104,214.26 -1104,311 -1118.58,325.58 -1118.58,353.95 -1118.63,354 -1118.63,443 -1118.63,472.37 -1092.1,498.9 -1092.1,535.6 ; v2(-1020.41,955) -899.37,955 ; -771.6,282.66 -771.6,253.4 -792.63,232.37 -792.63,199.95 -727.37,199.95 ; -750,1374.69 -739.78,1364.47 -637,1364.47 -492,1364.47 -437.53,1364.47 -427.31,1374.69 -377,1374.69 -310.69,1374.69 -204,1268 -204,1113 -226.37,1090.63 -226.37,1025 ; -604.63,320 -550,320 ; v1(-550,422) -550,320 ; -483.99,293.63 -523.63,293.63 -550,320 ; -483.99,372.37 -483.99,395.01 -470.66,408.34 -470.66,484.6 ; -421.4,760.66 -451,790.26 -451,893 -414.53,929.47 -414.53,955.62 -414.53,1002.47 -392,1025 -226.37,1025 ; -384,847 -384,871 -364.53,890.47 -364.53,955.62 ; -364.53,1180.02 -314.53,1180.02 ; -314.53,955.62 -314.53,895.53 -266,847 -207,847 -207,696.37 -176,665.37 ; -264.53,955.62 -157.99,955.62 ; -156,1032.37 -219,1032.37 -226.37,1025 ; -1590.37,1711.63 -1590.37,1705.37 -1522.37,1637.37
  Top Layer w31.5: v1(-2296,356) -2295.63,355.63 -2226.05,355.63 -2226.05,294.42 -2225,293.37 ; -2266.91,4929.16 -2268.87,4927.19 v3(-2329.9,4927.19) -2329.9,4799.24 -2288.56,4757.9 -2253.13,4757.9 ; v1(-2252,687) -2251.63,687.37 -2180,687.37 -2181.05,688.42 -2181.05,749.63 ; -2181.05,828.37 -2142.16,828.37 -2073,759.21 -1965.79,759.21 -1953.18,771.82 ; -2094.53,1639.09 -2094.53,1612.47 -2254,1453 -2254,1217 -2218,1181 -2074,1181 -2033,1222 -2033,1260.71 ; -2093.4,4116.16 -2093.4,4024.36 -2036.59,3967.54 ; v1@-2081.63,608.63 -2073,600 v1(-2068,595) ; -2072.02,4282.5 -2072.02,4309.08 ; -2033,1400 -2024.63,1391.63 -1796,1391.63 -1796,1317.42 -1797.05,1316.37 ; -2007.06,4078.76 -1948.99,4078.76 -1935.21,4064.98 ; -2007.06,4153.57 -1937.23,4153.57 -1937.23,4186 -1911.59,4211.64 ; v3(-1981.47,4211.64) -1911.59,4211.64 ; -1925.37,4757.9 -1881.08,4757.9 -1854.5,4731.32 -1810.21,4731.32 ; -1899,189.25 -1780,189.25 -1716.25,189.25 -1707.66,180.66 -1662.4,180.66 ; -1899,377.58 -1899,267.99 -1939.01,267.99 -1975,232 -1975,3 -1917,-55 -1763,-55 -1673,35 ; -1899,456.32 -1866.5,488.82 -1866.5,535.6 ; -1873,35 -1780,128 -1704,128 ; -1856.47,4064.98 -1856.47,4151.55 ; -1692.81,4116.16 -1692.81,4080.46 -1579.9,3967.54 -1574.98,3967.54 ; -1687.37,888 -1687.37,789.37 v1(-1687,789) -1669.82,771.82 -1640.75,771.82 ; -1673,1854.37 v1(-1673,2067) ; -1672,1854.37 -1628.74,1854.37 -1600.74,1826.37 ; -1664.54,4974.43 -1664.54,5064 ; -1640.75,535.6 -1640.75,444.38 -1639.37,443 ; -1625,267 -1669.37,267 -1780,377.63 -1746.37,377.63 -1681,443 -1639.37,443 ; -1615.37,443 -1639.37,443 ; -1606.47,4078.76 -1554.31,4078.76 -1540.53,4064.98 ; -1606.47,4857.31 -1585.8,4877.98 -1585.8,4974.43 -1448.99,4974.43 -1401.75,4927.19 ; -1590.75,771.82 -1590.75,835.38 -1608.63,853.26 -1608.63,888 -1608.63,926.37 -1587,948 -1420,948 -1307.63,1060.37 -1307.63,1129 -1307.63,1221.95 ; -1542.55,4153.57 -1606.47,4153.57 -1642.4,4189.49 -1692.59,4189.49 -1724.58,4221.48 -1901.75,4221.48 -1911.59,4211.64 ; -1540.35,357.72 -1540.35,535.6 ; -1540.35,711.35 -1540.35,771.82 -1540.35,822.28 -1516.37,846.26 -1516.37,872 ; -1536.13,443.5 -1535.63,443 ; -1511.63,1727 -1511.63,1816 ; v1(-1465,789) -1465,832 -1437.63,859.37 -1437.63,872 ; -1461.79,4064.98 -1461.79,4151.55 ; -1418.24,711.24 -1418.24,771.82 ; -1386.37,1221.95 -1386.37,1129 -1386.37,1064.63 -1461,990 -1873,990 -1953.18,909.82 -1953.18,771.82 ; -1330.95,456.37 -1330.95,477.05 -1317.85,490.15 -1317.85,535.6 ; -1326,849.58 -1317.85,841.43 -1317.85,771.82 ; -1273,35 -1183,-55 -763,-55 -673,35 ; -1230.37,888 -1230.37,834 -1237,827.37 v1(-1237,789) -1209.67,789 -1192.49,771.82 ; -1142.49,771.82 -1142.49,841.49 -1151.63,850.63 -1151.63,888 -1151.63,988.37 -1124.37,1015.63 -1124.37,1079.05 -1124.37,1172 ; -1092.1,711.1 -1092.1,771.82 -1092.1,778.9 -1074.37,796.63 -1074.37,887.95 -1074.37,976.63 -1045.63,1005.37 -1045.63,1079.05 -1045.63,1172 ; -1073,35 -1073,106 -1046.37,132.63 -1046.37,199.95 -1046.37,258.3 -1023,281.67 ; v1(-1019,812) -995.63,835.37 -995.63,887.95 ; -967.63,199.95 -871.37,199.95 -871.37,257.69 -846.4,282.66 ; -944.9,569.6 -944.9,526.9 -934.37,516.37 -934.37,481 -937,478.37 -937,360.46 -886.54,360.46 -878,369 -809,369 ; -855.63,481 -855.63,524.37 -844.5,535.5 -844.5,569.6 ; v1(-822,895) -820.63,896.37 -820.63,964 -757.32,964 -756.37,963.05 ; -806.31,2102 -847.68,2143.37 -913,2143.37 -913,2253 -911,2255 -911,2318 -884,2345 -769.63,2345 -722,2297.37 ; -753.63,1911 -687.92,1911 ; -750,1461.31 -671.31,1461.31 -653.21,1443.21 -637,1443.21 -637,1545.21 ; -733.37,429 -733.37,404.37 -683.37,354.37 -683.37,320 ; -722,2218.63 -684.63,2218.63 -675.9,2209.9 -627.34,2209.9 ; -677.63,963.05 v2@-586.05,963.05 ; -544.32,1911.05 -609.13,1911.05 -609.13,1947.87 -567,1990 -432.37,1990 -354.37,1912 ; -535.79,1548 -475.87,1548 -464.06,1559.81 -464.06,1512.94 -473.9,1503.1 -473.9,1461.31 ; -521,1709.63 -420.16,1709.63 ; -492,1443.21 -473.9,1461.31 ; -464.63,1912 -464.63,1865.63 -417,1818 -417,1811.21 -291.9,1811.21 -290,1809.31 ; -421.4,760.66 -502.66,760.66 -587.88,845.88 -644.5,845.88 -704.38,786 -824.68,786 -844.5,805.82 -844.5,766.5 -900,711 -1092,711 -1830,711 -1866.5,747.5 -1866.5,771.82 -1953.18,771.82 ; -391.12,2209.9 -308.48,2209.9 -298,2199.42 -297.95,2199.37 -200,2199.37 ; -377,1461.31 -473.9,1461.31 ; -330.05,586.58 -330.05,520.68 -292.37,483 -292.42,482.95 -292.42,389 ; -330.05,665.32 -330.05,714.05 -346.6,730.6 -346.6,760.66 -324,783.26 v1(-324,828) ; -326.27,1559.81 -212.19,1559.81 -177,1595 -177,1778 -208.31,1809.31 -290,1809.31 ; -298,2120.68 -309.18,2109.5 -391.12,2109.5 -627.34,2109.5 -712.19,2109.5 -719.69,2102 -719.69,2035.31 -763,1992 -785,1992 -832.37,1944.63 -832.37,1911 -871,1911 -891,1891 -891,1747 -868.63,1724.63 -816,1724.63 -812.98,1721.61 -746.37,1655 -325,1655 -290,1690 -290,1722.69 ; -213.68,389 -213.68,482.95 -213.63,483 -213.63,508.37 -176,546 -176,586.63 ; -200,2120.63 -200,2024 -275.63,1948.37 -275.63,1912 -275.63,1823.68 -290,1809.31 ; -169.6,760.66 -103.34,760.66 -52,812 v1(-52,951) ; -157.99,955.62 -156,953.63 v1@-54.63,953.63 ; -156,1032.37 -156,1317 -92,1381 -92,2101
  Top Layer w39.37: -2242.3,4190.97 -2242.3,4434.08 -2072.02,4604.35 ; -2225,214.63 -2225,211 -2189,175 -2118,175 ; -2198.01,3967.54 -2198.01,3895.7 -2257.88,3835.84 ; -2188.17,4929.16 -2127.47,4929.16 ; -2180,608.63 v1@-2081.63,608.63 ; v3(-2167.5,4698.84) -2316.12,4550.22 -2316.12,3894.08 -2257.88,3835.84 ; -2167,1260.71 -2167,1358 -1908,1617 ; v2@-2162.57,4095.5 -2170.45,4095.5 -2179.31,4104.35 -2163.56,4120.1 -2163.56,4190.97 -2072.02,4282.5 ; -2118,266.79 -2118,175 ; -2118,365.21 -2187.16,434.37 -2226.05,434.37 -2226.05,516.05 -2321,611 -2321,844 -2167,998 -2167,1099.29 -2033,1099.29 ; -2094.53,1639.09 -2098.46,1635.16 -2190,1635.16 -2190,1717.83 -2190,1812.32 -2190,1895 -2188.03,1893.03 -2094.53,1893.03 ; -2073,35 -2073,130 -2118,175 ; v1@-2073,600 -2073,660.79 ; -2048.73,4929.16 -1989.03,4929.16 ; -2036.59,3967.54 -2036.59,3914.55 -1957.88,3835.83 ; -2033,1260.71 -2033,1400 -1825,1608 -1825,2183 -1739,2269 -1739,2295 -1689,2345 -1689,2369 ; -1941.5,1583.5 -1908,1617 ; -1909.29,4930.16 -1849.6,4930.16 -1849.6,4874.04 -1810.21,4834.65 -1810.21,4829.75 -1726.55,4829.75 -1667.5,4770.69 -1606.47,4770.69 -975.57,4770.69 -901.75,4844.51 -901.75,4927.19 -901.75,4948.65 -851.75,4998.65 -851.75,5027.19 ; -1856.47,4151.55 -1856.53,4151.6 -1846.68,4161.44 v3(-1776.75,4161.44) ; -1789,2369 -1789,2342 -1839,2292 -1839,2269 -1887,2221 -1887,1638 -1908,1617 ; -1736.39,3967.54 -1736.39,3906.53 -1807.09,3835.84 -1807.09,3808.27 -1881.08,3734.28 -2191.12,3734.28 -2257.88,3801.03 -2257.88,3835.84 ; v3(-1719.66,5042.35) -1686.2,5042.35 -1664.54,5064 ; -1585.8,5064 -1487.38,5064 -1450.96,5100.42 -700.96,5100.42 -651.75,5051.2 -651.75,5027.19 -651.75,5000.02 -701.75,4950.02 -701.75,4927.19 ; -1574.98,3967.54 -1574.98,3903.72 -1507.09,3835.83 ; -1461.79,4151.55 -1461.84,4151.6 -1461.84,4175.22 v3@-1425.37,4211.69 ; -1401.75,4927.19 -1401.75,4950.81 -1351.75,5000.81 -1351.75,5027.19 ; -1330,189.2 -1330,92 -1273,35 ; -1301.75,4927.19 -1301.75,4948.84 -1251.75,4998.84 -1251.75,5027.19 ; -1239,2269 -1239,2285 -1189,2335 -1189,2369 ; -1201.75,4927.19 -1201.75,4948.06 -1151.75,4998.06 -1151.75,5027.19 ; -1101.75,4927.19 -1101.75,4956.52 -1051.75,5006.52 -1051.75,5027.19 ; -801.75,4868.13 -780.09,4846.48 -642.89,4846.48 -498.21,4991.16 -480.49,4991.16 ; -801.75,4927.19 -801.75,4947.47 -751.75,4997.47 -751.75,5019.9 ; -673,35 -673,116 -648.63,140.37 -648.63,199.95 -548.32,199.95 -547.37,199 ; -473,35 -331,177 -331,185.68 -282.32,185.68 -263,205 -263,315 -292.42,344.42 -292.42,389 ; -273,35 -273,55.63 -143,185.63 -186.63,185.63 -210,209 -210,385.32 -213.68,389
  Top Layer w47.24: v3(-563.17,4825.81) -484.42,4825.81 -480.49,4829.75 -320.06,4990.18
  Top Layer w59.06: -2072.02,4309.08 -1640.92,4309.08 -1386.64,4309.08 -1189.29,4111.73 ; -2072.02,4604.35 -1640.92,4604.35 -979.5,4604.35 -801.75,4782.11 -801.75,4868.13 -801.75,4927.19 ; -1189.29,3521.18 -989.35,3721.13 -989.35,3894.71 -199.98,4684.08 -199.98,4829.75 ; -1189.29,4308.58 -756.58,4308.58 -320.06,4745.1 -320.06,4829.75 ; -671.24,2690.97 -517.2,2845 -393.38,2845 -270.84,2722.46 ; -320.06,4990.18 -320.06,4991.17 -199.98,4991.17
  Top Layer w78.74: -1189.29,3718.03 -1189.29,4111.73
  Bottom Layer w11.81: v2(-1750,1773) -1726,1749 -1726,1680.59 -1520.41,1475 -1443.41,1475 -1402.41,1434 v2(-1402.41,1374.25) ; v2(-1437,1325) -1388,1325 -1357,1356 -1357,1433 -1426,1502 -1505,1502 -1694,1691 -1694,1769 -1737,1812 -1766,1812 -1862,1716 -1900,1716 -1913,1729 -1913,1776 -1817.5,1871.5 -1660,1871.5 -1653.5,1865 v2(-1220,1865) ; -1289,2369 -1289,2208 -1094,2013 v2(-1035,2013)
  Bottom Layer w15.75: v1(-1991,1877) -1801,2067 v1(-1673,2067) ; v1(-1978,1757) -1833,1902 -1126,1902 -1087,1863 v1(-1087,1788) ; v1(-1978,1816) -1864,1930 -1091,1930 -1043,1882 v1(-1043,1841) ; -1199,1512 -1199,1578 -1160,1617 v2(-877,1617)
  Bottom Layer w19.68: v2(-2117,1488) -1886,1257 v2(-1452,1257) ; v1(-1991,1639) -1827,1639 v1(-1769,1697) ; v2(-1852,916) -1656,916 -1199,1373 -1199,1512 ; -1647.41,1705 -1607.41,1665 -822.41,1665 v2(-768.41,1611) ; -1639,2269 -1797,2111 -1842,2111 -2041,1912 -2041,1619 -2011.79,1589.79 -1685.31,1589.79 -1499.52,1404 v2(-1448,1404) ; -1539,2269 -1539,2043 -1466.31,1970.31 v2(-942.41,1970.31) ; v2(-1217.41,1037.59) v2(-1217.41,1296) ; v2(-1158,1555) -1158,1092.59 v2(-1020.41,955) ; -1139,2269 -1068,2269 -707,1908 -707,1604.67 -744.67,1567 -1016,1567 -1069,1514 v2(-1069,1309)
  Bottom Layer w23.62: v2(-1880,1749) -1788,1841 -1701,1841 -1559,1699 -903,1699 v2(-757,1845) ; v1(-1828.01,316) -1752,316 v1(-1555,119) ; v1(-1384,321) -1173,110 v1(-1173,104)
  Bottom Layer w31.5: v1(-2296,356) -2336,396 -2336,687 ; v1(-2252,687) -2336,687 ; v1@-2067,578 -2067,229 -1873,35 ; v3(-1981.47,4211.64) -1981.47,4089.59 ; v1(-1687,789) v1(-1465,789) v1(-1237,789) -1214,812 v1(-1019,812) -979,812 -896,895 v1(-822,895) -324,895 ; -1401.75,4927.19 -1686.2,4642.74 -1928.32,4642.74 -2274.78,4296.28 -2274.78,4065.97 -2235.41,4026.6 -2044.46,4026.6 -1981.47,4089.59 ; -1189,2369 -1262,2442 -1922,2442 -2092,2272 -2092,1623 -2336,1379 -2336,687 ; -1001.75,4927.19 -1001.75,4855.93 -971.63,4825.81 v3(-563.17,4825.81) ; -951.75,5027.19 -877.53,5101.4 -532.65,5101.4 -465.72,5034.47 -465.72,4775.61 -516.91,4724.43 -1002.14,4724.43 -1352.54,4374.04 -1352.54,4182.11 -1445.06,4089.59 -1981.47,4089.59 ; -873,35 -873,99 v1(-550,422) ; v2(-698,1539) -585,1426 v2(-585,962) ; v1(-324,828) -324,895 ; v3(-185,1934) -52,1801 v1(-52,951) -108,895 -324,895
  Bottom Layer w39.37: v3(-2329.9,4927.19) -1401.75,4927.19 -1401.75,4951.8 -1351.75,5001.8 -1351.75,5027.19 ; v3(-2167.5,4698.84) -2028.72,4837.62 v3(-1716.71,4837.62) ; -1839,2269 -1839,2290 -1789,2340 -1789,2369 ; v3(-1776.75,4161.44) -1201.75,4736.44 -1201.75,4927.19 -1201.75,4946.09 -1151.75,4996.09 -1151.75,5027.19 ; -1739,2269 -1739,2290.01 -1689,2340.01 -1689,2369 ; v3(-1719.66,5042.35) -1468.68,5042.35 -1411.59,5099.43 -1295.45,5099.43 -1251.75,5055.73 -1251.75,5027.19 -1251.75,4999.43 -1301.75,4949.43 -1301.75,4927.19 ; v3(-1425.37,4214.59) -1425.37,4404.55 -1101.75,4728.17 -1101.75,4927.19 -1101.75,4952.58 -1051.75,5002.58 -1051.75,5027.19 ; -1239,2269 -1239,2283 -1189,2333 -1189,2369 ; -901.75,4927.19 -901.75,4945.89 -851.75,4995.89 -851.75,5027.19 ; -801.75,4927.19 -801.75,4950.42 -751.75,5000.42 -751.75,5027.19 ; -701.75,4927.19 -701.75,4950.02 -651.75,5000.02 -651.75,5027.19
  Bottom Layer w59.06: -2257.88,3135.83 -2257.88,2895.52 -2133.05,2770.69 -1950.96,2770.69 -1871.24,2690.97 ; -2257.88,3435.84 -2257.88,3346.31 -2133.05,3221.48 -2133.05,2970.69 -2041.71,2970.69 -2024.78,2953.76 -1922.62,2953.76 -1811.39,2842.54 -1798.4,2842.54 -1671.24,2715.38 -1671.24,2690.97 ; v2@-2179.31,4095.5 -2179.31,4104.35 -2179.31,4177.19 -2000.17,4356.32 -1778.72,4356.32 -1301.75,4833.29 -1301.75,4927.19 ; -1957.88,3235.35 -1957.88,3123.08 -1840.72,3005.93 -1774.78,3005.93 -1722.62,2953.76 -1722.62,2942.35 -1471.24,2690.97 ; -1807.09,3135.83 -1758.03,3135.83 -1576.95,2954.75 -1421.43,2954.75 -1271.24,2804.55 -1271.24,2690.97 ; -1807.09,3435.84 -1807.09,3352.21 -1555.29,3100.42 -1367.1,3100.42 -1221.43,2954.75 -1220.45,2953.76 ; -1507.09,3235.35 -1158.73,3235.35 -877.14,2953.76 -877.14,2696.87 -871.24,2690.97 ; -1077.14,2953.76 -1220.45,2953.76 ; -1071.24,2690.97 -1077.14,2696.87 -1077.14,2810.46 -1220.45,2953.76 ; -721.43,2943.92 -671.24,2893.72 -671.24,2880.14 ; -671.24,2690.97 -671.24,2880.14 ; -471.24,2690.97 -218.28,2943.92 -121.43,2943.92 ; -207.02,4309.39 -207.02,4138.96 -65.13,3997.07 -65.13,3000.22 -121.43,2943.92 ; -205.04,3521.18 -205.04,3346.34 -671.24,2880.14 ; -70.84,2722.46 -121.43,2773.05 -121.43,2943.92
  other v1: -14,305.42 -14,527 -2069,544 -2048,957 -2264,1033 -2264,1105 -1884,1118 -908,1126 -1483,1177 -412,1303 -708,1305 -1504,1319 -207,1387 -1906,1445 -207,1492 -838,1515 -963,1791 -962,1903 -1605,2002 -1294,2026 -642,2044 -315,2044 -2216,2049 -1482,2092 -20,2171 -2216,2207 -20,2296
  other v2: -2189.15,4083.69 -2217.69,4108.29 -2159.62,4108.29
  other v3: -185,1827 -210,1881

## Other copper
Top Layer:
  rectangle: -2103,503 -2036,629
  rectangle: -263,1788 -139,1971
  rectangle: -2238.36,4064 -2140.92,4129.94
  text "GENTEK" at 60.85,4707.7 h39.37 r90
  text "GNT604PWRR4" at 56.91,2653.57 h39.37 r90
  text "GNT604CPUR4" at 56,1555 h39.37 r90
  text "GENTEK" at 56,1228 h39.37 r90
Bottom Layer:
  rectangle: -2103,503 -2036,629
  rectangle: -240,1795 -139,1971
  rectangle: -2238.36,4063.02 -2139.94,4130.93

## Silkscreen, mask and mechanical layers (free items; w line width, h text height)
Mechanical 4:
  lines w10: -2387,-95 -2387,1548 -2249.2,1548 -2249.2,1981 -2387,1981 -2387,2483.74 -537.81,2483.74 -537.81,2365.63 -104.74,2365.63 -104.74,2483.74 93.32,2483.74 93.32,-95 -2387,-95 ; -2386,2564 -2386,5142.74 -2189.15,5142.74 -2189.15,5024.63 -1756.08,5024.63 -1756.08,5142.74 94.31,5142.74 94.31,2564 -2386,2564